# Altium PCB pcb.PcbDoc
Units mil, origin at the board's own origin, x right, y up, seen from the top; angles counter-clockwise.
Board outline 6000 x 4000 mil, 2 copper layers (Top Layer, Bottom Layer); 3 components, 0 nets, 110 pads, 0 vias.
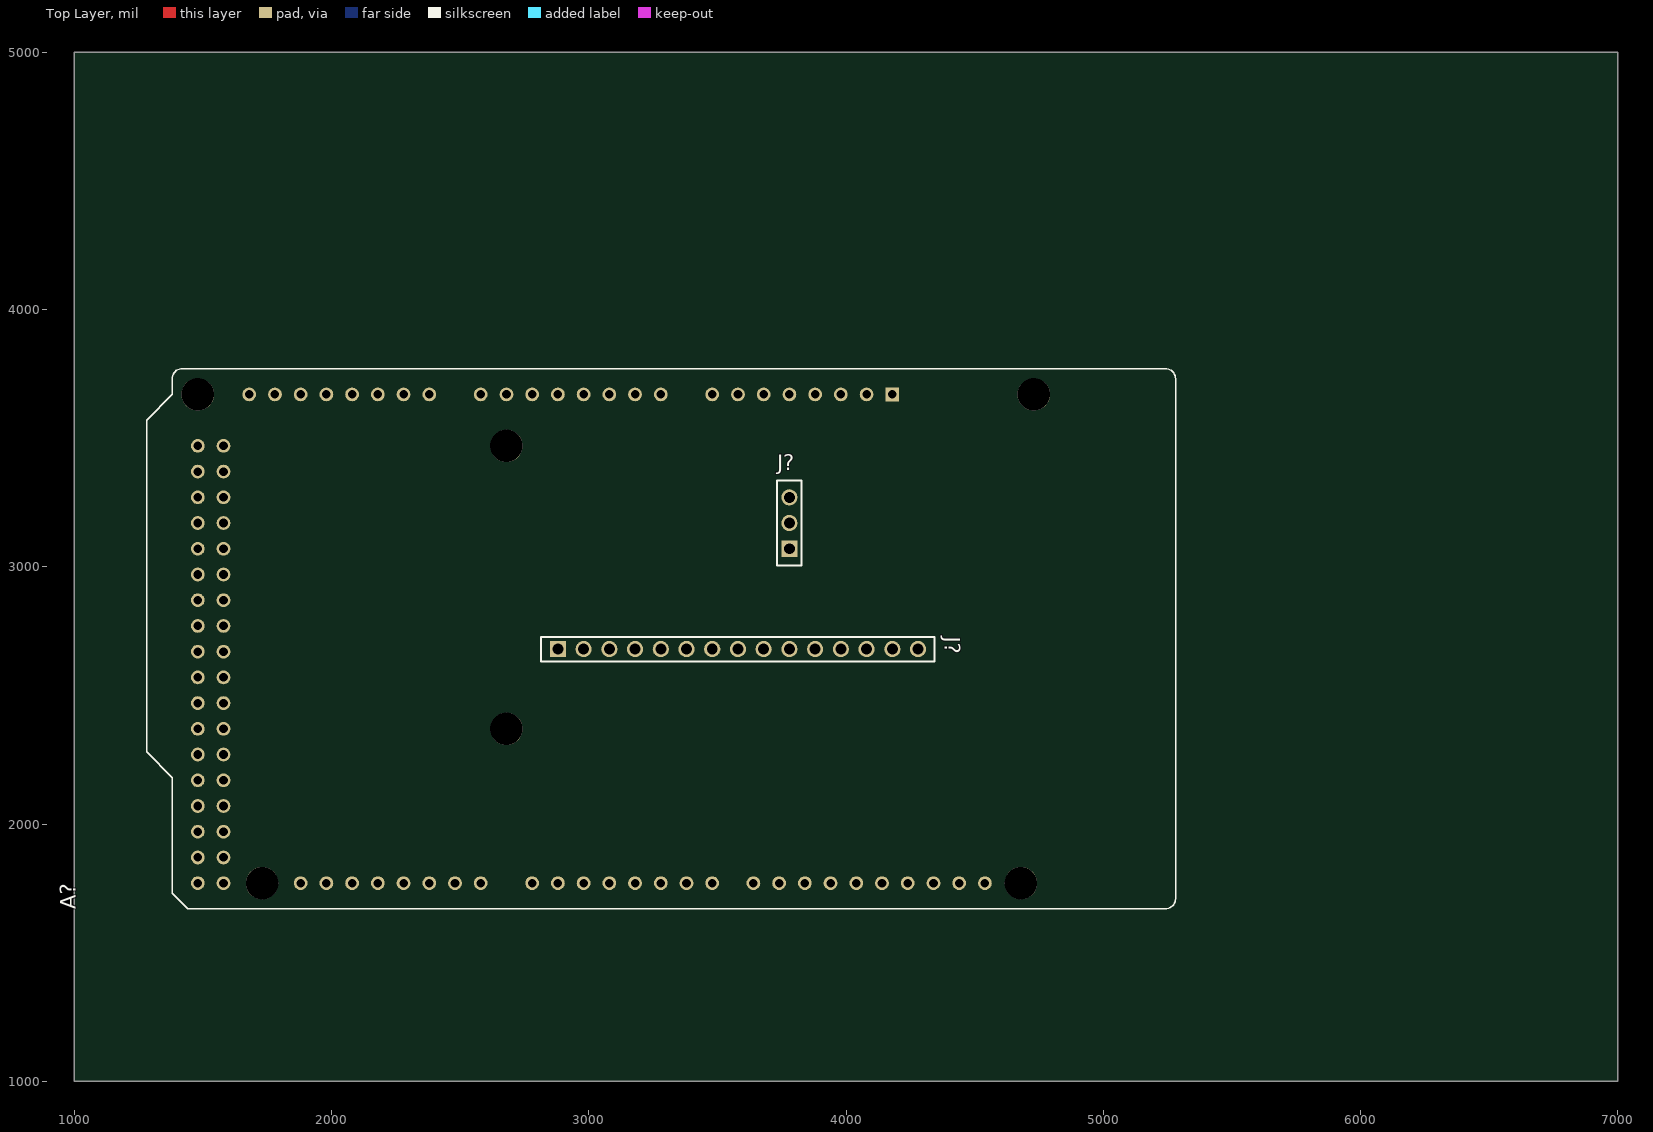
[diagram p0: Top Layer view]
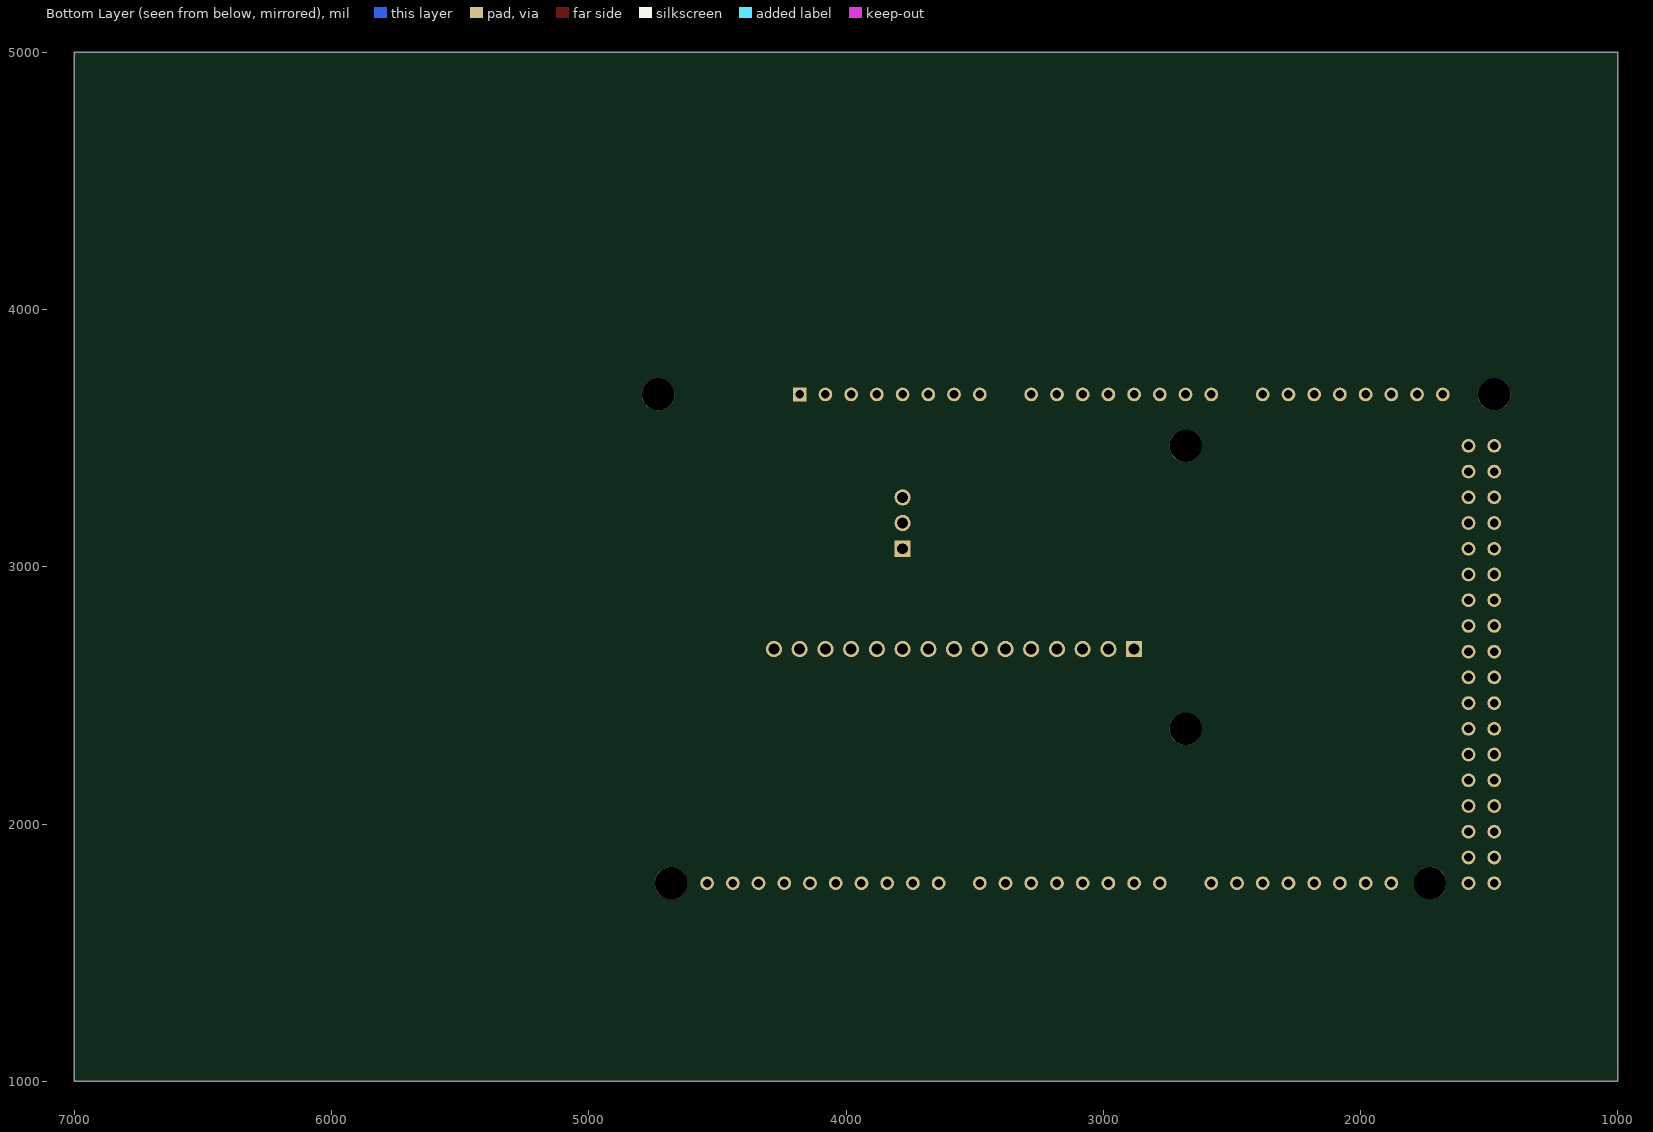
[diagram p1: Bottom Layer view, seen from below]

## Layer stack, top to bottom
Top Solder: solder mask 0.4, Solder Resist, Dk 3.5
Top Layer: signal copper 1.4
Dielectric 1: dielectric 12.6, FR-4, Dk 4.8
Bottom Layer: signal copper 1.4
Bottom Solder: solder mask 0.4, Solder Resist, Dk 3.5

## Board outline
1000,1000 7000,1000 7000,5000 1000,5000

## Design rules (kind name [scope] priority, off if disabled: settings)
Clearance [All] p1: gap=10 ignorepadtopadclearanceinfootprint=FALSE
PolygonConnect [All] p1: connectstyle=Relief reliefconductorwidth=10 reliefentries=4 polygonreliefangle="90 Angle" airgapwidth=10
RoutingVias [All] p1: holewidth=28 width=50 viastyle="Through Hole" minholewidth=28 minwidth=50 maxholewidth=28 maxwidth=50
SolderMaskExpansion [All] p1: expansion=4 istentingtop=FALSE
Width [All] p1: maxlimit=10 minlimit=10 preferedwidth=10
30 further rules are at their usual default settings.

## Classes and differential pairs
component class schematic: A? J?

## Components (designator, comment, footprint, x,y, rotation, side; value= is the part's Value field where it differs from the comment)
A? "A000067" PCBComponent_1 -3265,-2440 r180 top
J? "PHF-115-01-L-S" SMTC-PHF-115-01-X-S 2880,2680 r0 top
J? "PHF-103-01-L-S-001" SMTC-PHF-103-01-X-S-001 3780,3070 r90 top

## Footprints (in the part's own frame and the unit in brackets; to place one, negate y for a bottom-side part, rotate by r counter-clockwise, add the part's x,y. Pads: shape width x height; smd on the part's side, far side on the other; paste and mask are expansions set on the pad)
PCBComponent_1 [mil]
  round 53.46 hole 33.46: 0(-6045,-4210) 1(-6145,-4210) 2(-6245,-4210) 3(-6345,-4210) 3V3(-7145,-6110) 4(-6445,-4210) 5(-6545,-4210) 5V_1(-7045,-6110) 5V_2(-4845,-4210) 5V_3(-4745,-4210) 6(-6645,-4210) 7(-6745,-4210) 8(-6905,-4210) 9(-7005,-4210) 10(-7105,-4210) 11(-7205,-4210) 12(-7305,-4210) 13(-7405,-4210) 14(-5845,-4210) 15(-5745,-4210) 16(-5645,-4210) 17(-5545,-4210) 18(-5445,-4210) 19(-5345,-4210) 20(-5245,-4210) 21(-5145,-4210) 22(-4845,-4310) 23(-4745,-4310) 24(-4845,-4410) 25(-4745,-4410) 26(-4845,-4510) 27(-4745,-4510) 28(-4845,-4610) 29(-4745,-4610) 30(-4845,-4710) 31(-4745,-4710) 32(-4845,-4810) 33(-4745,-4810) 34(-4845,-4910) 35(-4745,-4910) 36(-4845,-5010) 37(-4745,-5010) 38(-4845,-5110) 39(-4745,-5110) 40(-4845,-5210) 41(-4745,-5210) 42(-4845,-5310) 43(-4745,-5310) 44(-4845,-5410) 45(-4745,-5410) 46(-4845,-5510) 47(-4745,-5510) 48(-4845,-5610) 49(-4745,-5610) 50(-4845,-5710) 51(-4745,-5710) 52(-4845,-5810) 53(-4745,-5810) AD0(-6545,-6110) AD1(-6445,-6110) AD2(-6345,-6110) AD3(-6245,-6110) AD4(-6145,-6110) AD5(-6045,-6110) AD6(-5945,-6110) AD7(-5845,-6110) AD8(-5645,-6110) AD9(-5545,-6110) AD10(-5445,-6110) AD11(-5345,-6110) AD12(-5245,-6110) AD13(-5145,-6110) AD14(-5045,-6110) AD15(-4945,-6110) AREF(-7605,-4210) GND1(-6945,-6110) GND2(-6845,-6110) GND3(-7505,-4210) GND4(-4845,-5910) GND5(-4745,-5910) IOREF(-7345,-6110) RESET(-7245,-6110) SCL(-7805,-4210) SDA(-7705,-4210) VIN(-6745,-6110)
  rect 53.46x53.46 / inner round 53.46 / far side rect 53.46x53.46 hole 33.46: NC(-7445,-6110)
  round 125.98 hole 125.98 unplated: ""(-7995,-6110) ""(-7945,-4210) ""(-5945,-5910) ""(-5945,-4810) ""(-4995,-4210) ""(-4745,-6110)
  silkscreen extent -8546,-6211 -4546,-4111, body extent -8554,-6204 -4302,-4117, height 521
SMTC-PHF-103-01-X-S-001 [mm] "Press Fit Socket Assembly, 1x3 Pins, Vertical, 2.54mm Pitch, Female"
  rect 1.6x1.6 hole 1.081: 1(0,0)
  round 1.6 hole 1.081: 2(2.54,0) 3(5.08,0)
  silkscreen extent -1.65,-1.2 6.73,1.2, body extent -1.52,-1.2 6.6,1.21, height 8.51
SMTC-PHF-115-01-X-S [mm] "Press Fit Socket Assembly, 1x15 Pins, Vertical, 2.54mm Pitch, Female"
  rect 1.6x1.6 hole 1.081: 1(0,0)
  round 1.6 hole 1.081: 2(2.54,0) 3(5.08,0) 4(7.62,0) 5(10.16,0) 6(12.7,0) 7(15.24,0) 8(17.78,0) 9(20.32,0) 10(22.86,0) 11(25.4,0) 12(27.94,0) 13(30.48,0) 14(33.02,0) 15(35.56,0)
  silkscreen extent -1.65,-1.2 37.21,1.2, body extent -1.52,-1.21 37.08,1.2, height 8.51

## Part data
A?: "Arduino Mega 2560 Rev3 Microcontroller Board, ATmega2560", Package="Non-Standard Arduino", Check_prices=https://www.snapeda.com/parts/A000067/Arduino/view-part/?ref=eda, MF=Arduino, MP=A000067, SnapEDA_Link=https://www.snapeda.com/parts/A000067/Arduino/view-part/?ref=snap
J?: library part CMP-1023-00117-1, "Press Fit Socket, Through-hole, Vertical, -55 to 125 degC, 2.54 mm Pitch, 15-Pin, Female, RoHS", Manufacturer=Samtec, Temperature Range="-55 to 125 degC", ComponentLink1Description="Manufacturer URL", ComponentLink1URL=http://www.samtec.com, ComponentLink2Description=Datasheet, ComponentLink2URL=http://www.samtec.com/documents/webfiles/pdf/phf.pdf, ComponentLink3Description="Package Specification", ComponentLink3URL=http://www.samtec.com/documents/webfiles/cpdf/PHF-1XX-XX-X-X-XXX-MKT.pdf, DatasheetVersion=F-214, Mounting Technology=Through-hole, Orientation=Vertical, PackageDescription=".100 Press Fit Socket Assembly", PackageReference=PHF-115-01-X-S, PackageVersion="F, 9/2009", PartNumber=PHF-115-01-L-S, Pitch="2.54 mm", RoHS=True
J?: library part CMP-1023-00107-1, "Press Fit Socket, Through-hole, Vertical, -55 to 125 degC, 2.54 mm Pitch, 3-Pin, Female, RoHS", Manufacturer=Samtec, Temperature Range="-55 to 125 degC", ComponentLink1Description="Manufacturer URL", ComponentLink1URL=http://www.samtec.com, ComponentLink2Description=Datasheet, ComponentLink2URL=http://www.samtec.com/documents/webfiles/pdf/phf.pdf, ComponentLink3Description="Package Specification", ComponentLink3URL=http://www.samtec.com/documents/webfiles/cpdf/PHF-1XX-XX-X-X-XXX-MKT.pdf, DatasheetVersion=F-214, Mounting Technology=Through-hole, Orientation=Vertical, PackageDescription=".100 Press Fit Socket Assembly", PackageReference=PHF-103-01-X-S-001, PackageVersion="F, 9/2009", PartNumber=PHF-103-01-L-S-001, Pitch="2.54 mm", RoHS=True

## Nets (pads, with @x,y where several pads share a name; then routed paths per layer and width w, separated by ;. In a path a pad name is that pad's centre, name@x,y a point inside that pad or via, vN(x,y) a via of type N, cw(c..) or ccw(c..) an arc to the next point about the centre after c; other vN are vias at no path point)
pads on no net: A?. A?.0 A?.1 A?.2 A?.3 A?.3V3 A?.4 A?.5 A?.5V_1 A?.5V_2 A?.5V_3 A?.6 A?.7 A?.8 A?.9 A?.10 A?.11 A?.12 A?.13 A?.14 A?.15 A?.16 A?.17 A?.18 A?.19 A?.20 A?.21 A?.22 A?.23 A?.24 A?.25 A?.26 A?.27 A?.28 A?.29 A?.30 A?.31 A?.32 A?.33 A?.34 A?.35 A?.36 A?.37 A?.38 A?.39 A?.40 A?.41 A?.42 A?.43 A?.44 A?.45 A?.46 A?.47 A?.48 A?.49 A?.50 A?.51 A?.52 A?.53 A?.AD0 A?.AD1 A?.AD2 A?.AD3 A?.AD4 A?.AD5 A?.AD6 A?.AD7 A?.AD8 A?.AD9 A?.AD10 A?.AD11 A?.AD12 A?.AD13 A?.AD14 A?.AD15 A?.AREF A?.GND1 A?.GND2 A?.GND3 A?.GND4 A?.GND5 A?.IOREF A?.NC A?.RESET A?.SCL A?.SDA A?.VIN J?.1 J?.2 J?.3 J?.4 J?.5 J?.6 J?.7 J?.8 J?.9 J?.10 J?.11 J?.12 J?.13 J?.14 J?.15